# Altium PCB MainBoardPCB.PcbDoc (part 9 of 50)
Units mm, origin at the board's own origin, x right, y up, seen from the top; angles counter-clockwise.
Board outline 258.95 x 308.86 mm, 16 copper layers (L1, L2 (GND), L3 (Sign), L4 (GND), L5 (Sign), L6 (PWR/GND), L7(12V+Other), L8 (Plane_GND), L9 (PWR/GND), L10 (3V3+Other), L11 (PWR/GND), L12 (Sign), L13 (GND), L14 (Sign), L15 (GND), L16), stack 2.503 mm thick; 2578 components, 1867 nets, 8817 pads, 8021 vias.
Unrouted connection lines stored in the file: 25.
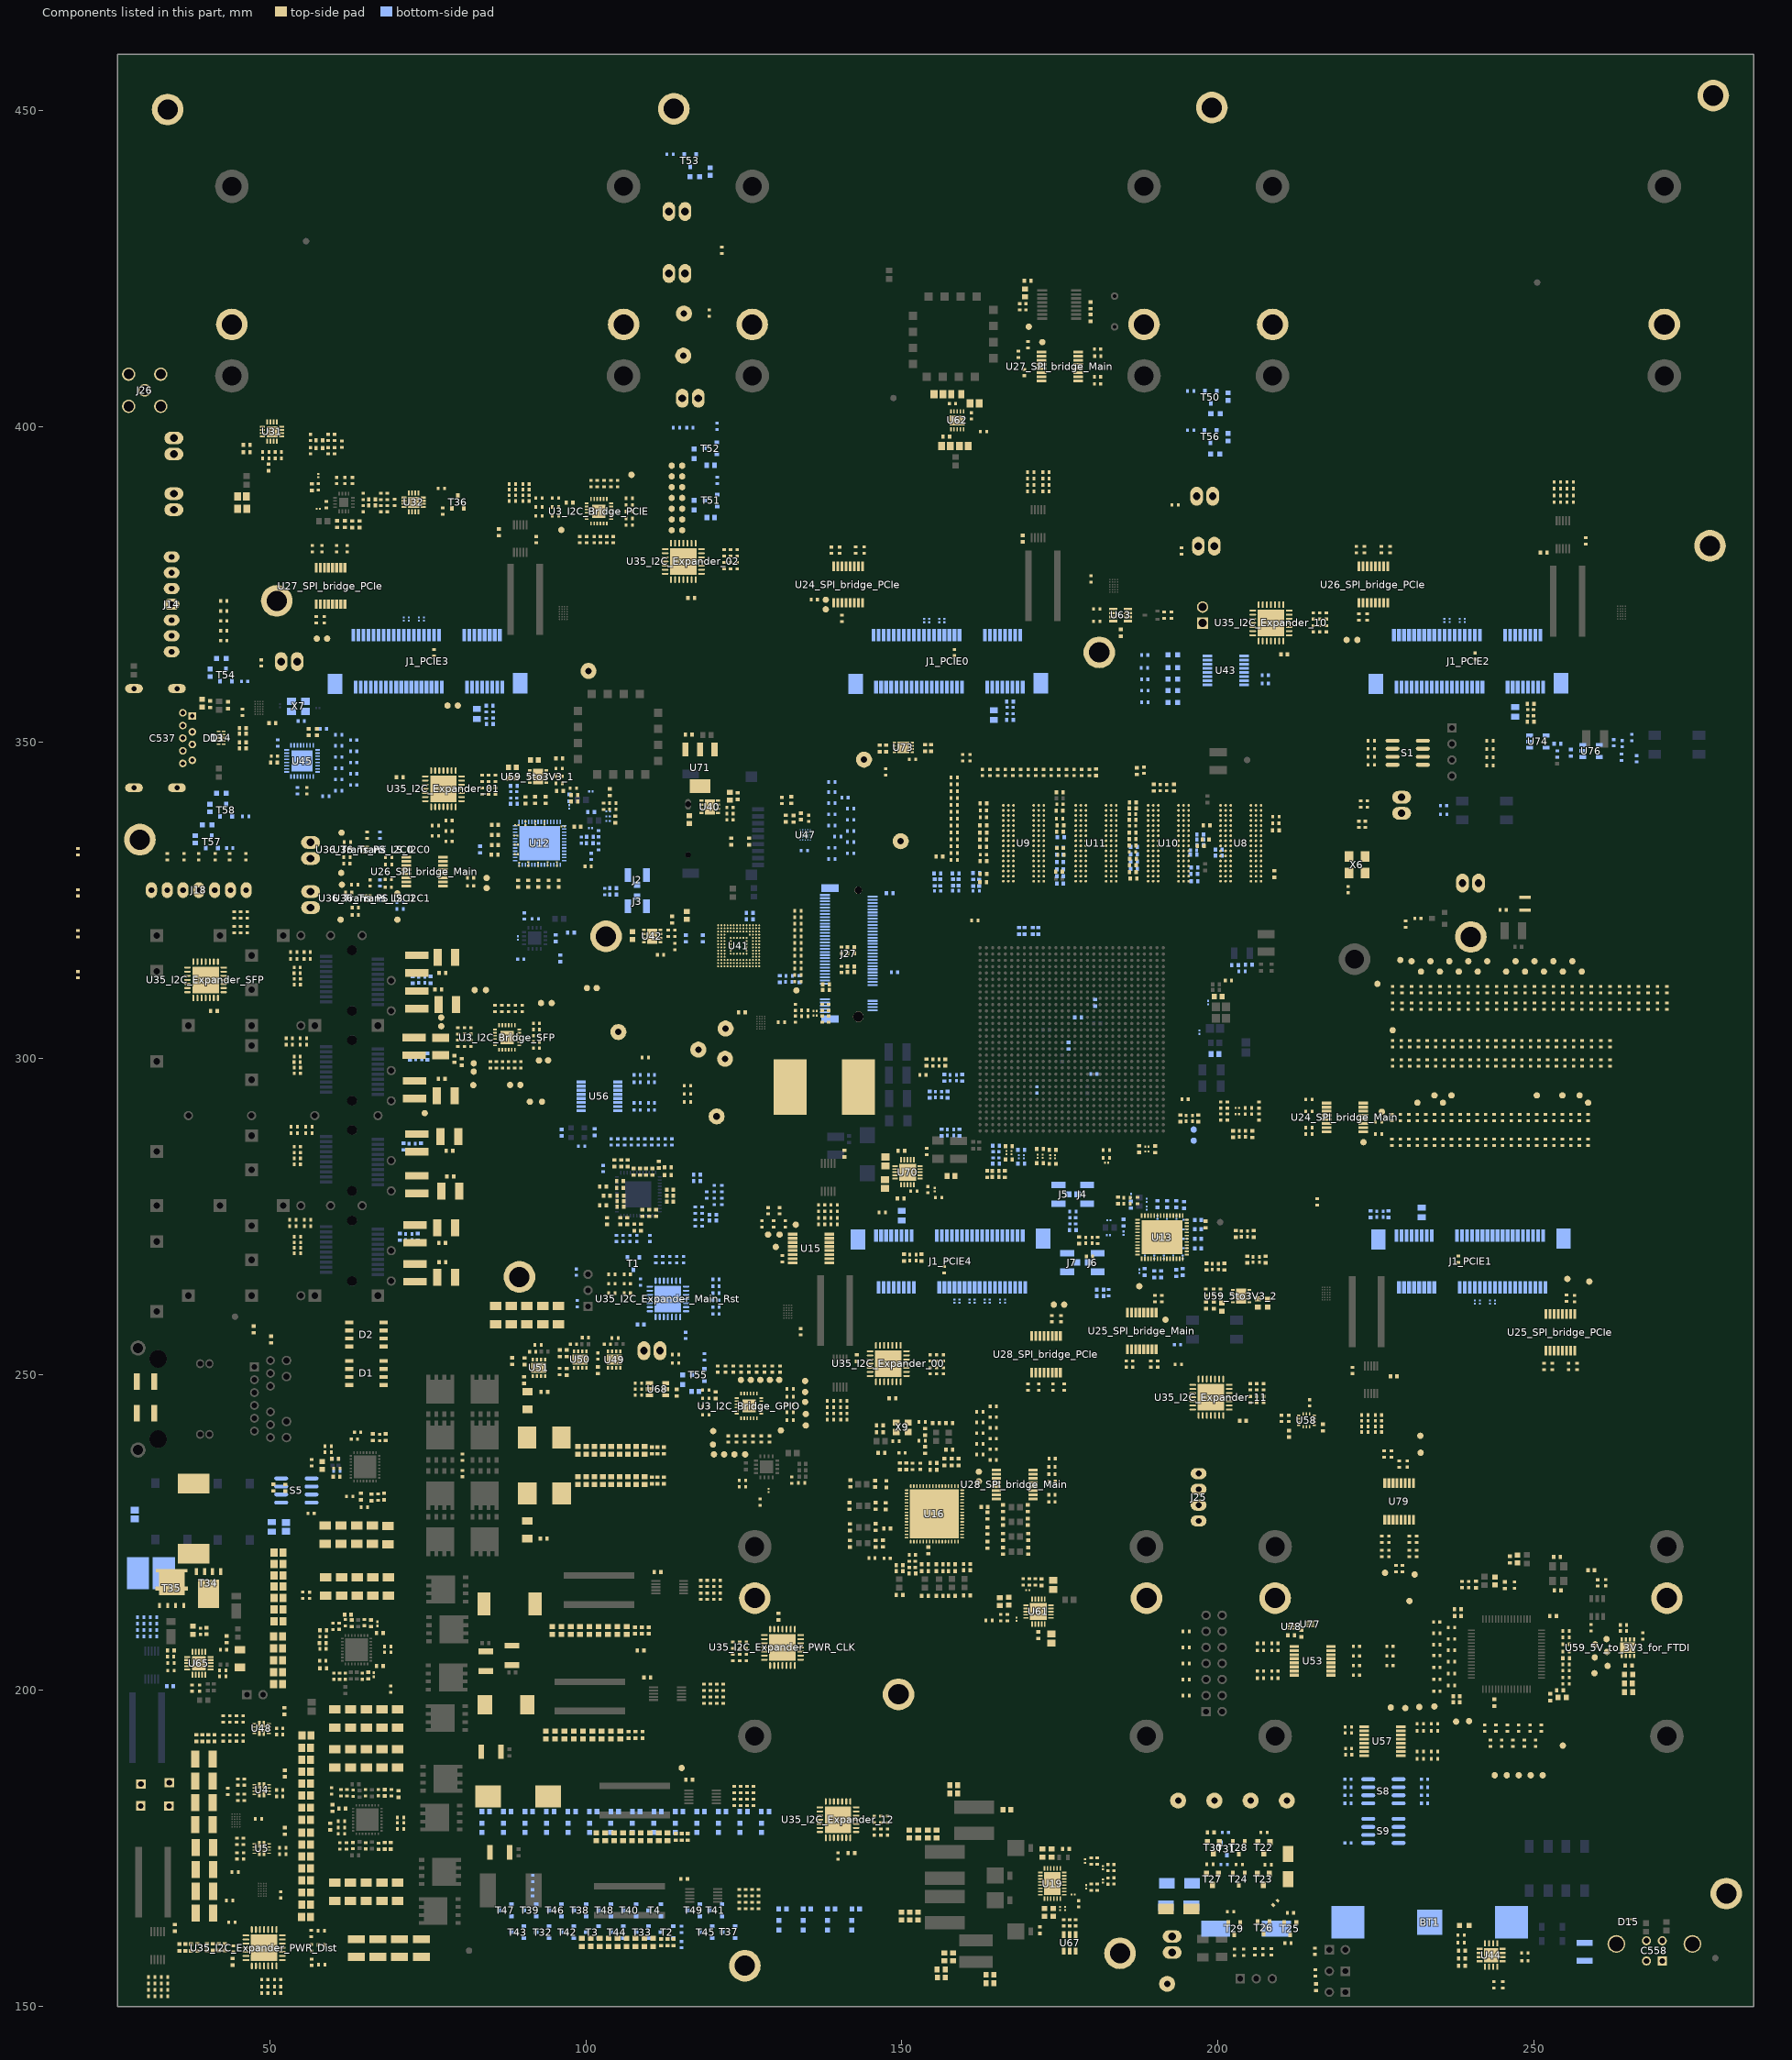
[diagram p21: the components of this part, seen from the top]

## Part data (continued)
C549: library part Capacitor, Case/Package=0402, Case Code (Metric)=1005, Dielectric=X7R, Dielectric Material=Ceramic, Insulation Resistance=100GR, Manufacturer=Yageo, Manufacturer Part Number=CC0402KRX7R9BB221, Max Operating Temperature=125°C, Min Operating Temperature=-55°C, Package Quantity=1, Supplier Part Number 1=311-1035-1-ND, Tolerance=10%, Voltage Rating=50V, Capacitance=220pF, Case Code (Imperial)=0402, ComponentLink1Description=https://datasheet.ciiva.com/5789/1489800-5789552.pdf?src-supplier=Farnell, ComponentLink1URL=https://datasheet.ciiva.com/5789/1489800-5789552.pdf?src-supplier=Farnell, ComponentLink2Description=https://datasheet.ciiva.com/26862/getdatasheetpartid-403476-26862648.pdf?src-supplier=Verical, ComponentLink2URL=https://datasheet.ciiva.com/26862/getdatasheetpartid-403476-26862648.pdf?src-supplier=Verical, ComponentLink3Description=https://datasheet.ciiva.com/143/mlccorderingcode-143968.pdf?src-supplier=Digi-Key, ComponentLink3URL=https://datasheet.ciiva.com/143/mlccorderingcode-143968.pdf?src-supplier=Digi-Key, ComponentLink4Description=https://datasheet.ciiva.com/143/mlccorderingcode-143969.pdf?src-supplier=Digi-Key, ComponentLink4URL=https://datasheet.ciiva.com/143/mlccorderingcode-143969.pdf?src-supplier=Digi-Key, ComponentLink5Description=https://datasheet.ciiva.com/143/mlccorderingcode-143970.pdf?src-supplier=Digi-Key, ComponentLink5URL=https://datasheet.ciiva.com/143/mlccorderingcode-143970.pdf?src-supplier=Digi-Key, ComponentLink6Description=https://datasheet.ciiva.com/11464/upy-gphc-x7r-6-3v-to-50v-8-11464901.pdf?src-supplier=Avnet, ComponentLink6URL=https://datasheet.ciiva.com/11464/upy-gphc-x7r-6-3v-to-50v-8-11464901.pdf?src-supplier=Avnet, ComponentLink7Description=https://datasheet.ciiva.com/8033/1489800-8033623.pdf?src-supplier=Element14, ComponentLink7URL=https://datasheet.ciiva.com/8033/1489800-8033623.pdf?src-supplier=Element14, ComponentLink8Description=https://datasheet.ciiva.com/8033/1489800-8033624.pdf?src-supplier=Element14, ComponentLink8URL=https://datasheet.ciiva.com/8033/1489800-8033624.pdf?src-supplier=Element14, ComponentLink9Description=https://datasheet.ciiva.com/13209/upy-gp-np0-16v-to-50v-8-13209048.pdf?src-supplier=Mouser, ComponentLink9URL=https://datasheet.ciiva.com/13209/upy-gp-np0-16v-to-50v-8-13209048.pdf?src-supplier=Mouser, ComponentLink10Description=https://datasheet.ciiva.com/28450/1489800-28450392.pdf?src-supplier=Element14, ComponentLink10URL=https://datasheet.ciiva.com/28450/1489800-28450392.pdf?src-supplier=Element14, ComponentLink11Description=https://datasheet.ciiva.com/17437/upy-gphc-x7r-6-3v-to-50v-8-17437183.pdf?src-supplier=Avnet+Europe, ComponentLink11URL=https://datasheet.ciiva.com/17437/upy-gphc-x7r-6-3v-to-50v-8-17437183.pdf?src-supplier=Avnet+Europe, Composition=Ceramic, Depth=0.5mm, Halogen Free="Halogen Free", Height=0.5mm, Lead Free="Lead Free", Length=1mm, Mount="Surface Mount", Number of Pins=2, Packaging="Tape and Reel", Pricing 1="1 = 0,10000, 10 = 0,02600, 100 = 0,01180, 500 = 0,00844, 1000 = 0,00662, 2500 = 0,00602, 5000 = 0,00554 (USD)", Radiation Hardening=No, REACH SVHC="No SVHC", RoHS=Yes, Stock 1=92511, Supplier 1=Digi-Key, Termination=SMD/SMT, Thickness=0.022inch, Voltage Rating (DC)=50V, Weight=2.3E-05oz, Width=0.02inch
C558: "WR-COM USB Vertical Type B", Manufacturer="Würth Elektronik eiSos GmbH", partNo=61400413321, ComponentLink1 Description=Manufacturer, ComponentLink1URL=http://www.we-online.de, ComponentLink2 Description=Datasheet, ComponentLink2URL=http://katalog.we-online.de/em/datasheet/61400413321.pdf, Created by="Karrer Zheng", Created Date=10/10/2014, NoPins=4
C567_5to3V3_1 C567_5to3V3_2: library part Capacitor, "CAP CER 2.2UF 6.3V X5R 0402", Case Code (Imperial)=0402, Case Code (Metric)=1005, Dielectric=X5R, Manufacturer="Taiyo Yuden", Manufacturer Part Number=JMK105BJ225KV-F, Max Operating Temperature=85°C, Min Operating Temperature=-55°C, Package Quantity=10000, Supplier Part Number 1=587-5867-1-ND, Tolerance=10%, Voltage Rating=6.3V, Capacitance=2.2uF, Case/Package=0402, Category="Ceramic Capacitors", ComponentLink1Description=https://datasheet.ciiva.com/15921/tmk105b7103kv-15921011.pdf?src-supplier=Onlinecomponents.com, ComponentLink1URL=https://datasheet.ciiva.com/15921/tmk105b7103kv-15921011.pdf?src-supplier=Onlinecomponents.com, ComponentLink2Description=https://datasheet.ciiva.com/30178/cmultilayerceramiccapacitor-30178599.pdf?src-supplier=Onlinecomponents.com, ComponentLink2URL=https://datasheet.ciiva.com/30178/cmultilayerceramiccapacitor-30178599.pdf?src-supplier=Onlinecomponents.com, Composition=Ceramic, Depth=0.5mm, Height=0.5mm, Length=1mm, Mount="Surface Mount", Packaging="Tape and Reel", Pricing 1="1=0,10000, 10=0,06000, 100=0,02650, 500=0,01894, 1000=0,01488, 2500=0,01352, 5000=0,01244 (USD)", Radiation Hardening=No, RoHS=Yes, Stock 1=4812, Supplier 1=Digi-Key, Termination=SMD/SMT, Thickness=0.022inch, Voltage Rating (DC)=6.3V, Width=0.5mm
C571 C719: library part Capacitor, "CAP CER 1000PF 25V X5R 0201", Case/Package=0201, Dielectric=X5R, Manufacturer=Murata, Manufacturer Part Number=GRM033R61E102KA01D, Max Operating Temperature=85°C, Min Operating Temperature=-55°C, Supplier Part Number 1=490-14452-1-ND, Tolerance=10%, Voltage Rating (DC)=25V, Capacitance=1nF, Category="Ceramic Capacitors", ComponentLink1Description=http://components.arrow.com/part/dataview/0323_06094941?src-supplier=Arrow+Europe, ComponentLink1URL=http://components.arrow.com/part/dataview/0323_06094941?src-supplier=Arrow+Europe, ComponentLink2Description=https://search.murata.co.jp/Ceramy/image/img/A01X/G101/ENG/GRM033R61E102KA01-01.pdf?src-supplier=Digi-Key, ComponentLink2URL=https://search.murata.co.jp/Ceramy/image/img/A01X/G101/ENG/GRM033R61E102KA01-01.pdf?src-supplier=Digi-Key, ComponentLink3Description=http://search.murata.co.jp/Ceramy/image/img/A01X/G101/ENG/GRM033R61E102KA01-01.pdf?src-supplier=Digi-Key, ComponentLink3URL=http://search.murata.co.jp/Ceramy/image/img/A01X/G101/ENG/GRM033R61E102KA01-01.pdf?src-supplier=Digi-Key, Depth=0.3mm, Length=0.6mm, Packaging="Tape and Reel", Pricing 1="1=0,10000, 10=0,01800, 100=0,00790, 500=0,00564, 1000=0,00443, 2500=0,00402, 5000=0,00370 (USD)", RoHS=Yes, Stock 1=80983, Supplier 1=Digi-Key, Thickness=300um, Width=300um
C595 C596 C695 C696 C697 C698 C699: library part Capacitor, Dielectric=X5R, Manufacturer=Murata, Manufacturer Part Number=GRM21BR61H106KE43L, Supplier Part Number 1=490-18663-1-ND, Tolerance=10%, Voltage Rating (DC)=50V, Capacitance=10uF, Category="Ceramic Capacitors", Length=2mm, Pricing 1="1=0,49000, 10=0,33800, 100=0,20270, 500=0,15198, 1000=0,12835 (USD)", RoHS=No, Stock 1=3437, Supplier 1=Digi-Key, Thickness=1.25mm, Width=1.25mm
C603 C612: library part Capacitor, Case Code (Imperial)=0201, Case Code (Metric)=0603, Dielectric=C0G, Manufacturer=Murata, Manufacturer Part Number=GRM0335C1H430GA01D, Max Operating Temperature=125°C, Min Operating Temperature=-55°C, Package Quantity=15000, Supplier Part Number 1=490-14799-1-ND, Tolerance=2%, Voltage Rating=50V, Capacitance=43pF, Case/Package=0201, ComponentLink1Description=http://components.arrow.com/part/dataview/0323_07279725?src-supplier=Arrow+Europe, ComponentLink1URL=http://components.arrow.com/part/dataview/0323_07279725?src-supplier=Arrow+Europe, ComponentLink2Description=http://www.mouser.com/ds/2/281/c02e-2905.pdf?src-supplier=Mouser, ComponentLink2URL=http://www.mouser.com/ds/2/281/c02e-2905.pdf?src-supplier=Mouser, ComponentLink3Description=http://components.arrow.com/part/dataview/55790600S306921N2606?src-supplier=Arrow, ComponentLink3URL=http://components.arrow.com/part/dataview/55790600S306921N2606?src-supplier=Arrow, ComponentLink4Description=https://search.murata.co.jp/Ceramy/image/img/A01X/G101/ENG/GRM0335C1H430GA01-01.pdf?src-supplier=Digi-Key, ComponentLink4URL=https://search.murata.co.jp/Ceramy/image/img/A01X/G101/ENG/GRM0335C1H430GA01-01.pdf?src-supplier=Digi-Key, ComponentLink5Description=http://search.murata.co.jp/Ceramy/image/img/A01X/partnumbering_e_01.pdf?src-supplier=Digi-Key, ComponentLink5URL=http://search.murata.co.jp/Ceramy/image/img/A01X/partnumbering_e_01.pdf?src-supplier=Digi-Key, ComponentLink6Description=http://psearch.en.murata.com/capacitor/product/GRM0335C1H430GA01%23.pdf?src-supplier=Avnet, ComponentLink6URL=http://psearch.en.murata.com/capacitor/product/GRM0335C1H430GA01%23.pdf?src-supplier=Avnet, Depth=0.3mm, Lead Free="Lead Free", Length=0.024inch, Mount="Surface Mount", Packaging="Tape and Reel", Pricing 1="1 = 0,10000, 10 = 0,01800, 100 = 0,00810, 500 = 0,00578, 1000 = 0,00454, 2500 = 0,00412, 5000 = 0,00380 (USD)", RoHS=Yes, Stock 1=52010, Supplier 1=Digi-Key, Termination=SMD/SMT, Thickness=0.012inch, Voltage Rating (DC)=50V, Width=0.012inch
C605 C616: library part Capacitor, Case Code (Imperial)=0201, Case Code (Metric)=0603, Dielectric=C0G, Manufacturer=Murata, Manufacturer Part Number=GRM0335C1E101JA01D, Max Operating Temperature=125°C, Min Operating Temperature=-55°C, Package Quantity=15000, Supplier Part Number 1=490-3160-1-ND, Tolerance=5%, Voltage=25V, Capacitance=100pF, Case/Package=0201, ComponentLink1Description=https://datasheet.ciiva.com/16497/grm0335c1e101ja01-01-16497112.pdf?src-supplier=Future+Electronics, ComponentLink1URL=https://datasheet.ciiva.com/16497/grm0335c1e101ja01-01-16497112.pdf?src-supplier=Future+Electronics, ComponentLink2Description=https://datasheet.ciiva.com/18697/product-18697797.pdf?src-supplier=Digi-Key, ComponentLink2URL=https://datasheet.ciiva.com/18697/product-18697797.pdf?src-supplier=Digi-Key, Depth=0.3mm, Height=0.3mm, Lead Free="Lead Free", Length=0.6mm, Mount="Surface Mount", Packaging="Tape and Reel", Pricing 1="1 = 0,10000, 10 = 0,01300, 100 = 0,00560, 500 = 0,00400, 1000 = 0,00315, 2500 = 0,00286, 5000 = 0,00263 (USD)", Radiation Hardening=No, REACH SVHC="No SVHC", RoHS=Yes, Stock 1=1884783, Supplier 1=Digi-Key, Termination=SMD/SMT, Thickness=0.013inch, Voltage Rating=25V, Voltage Rating (DC)=25V, Width=0.012inch
C609: "Supercapacitors / Ultracapacitors 0.22F 5.5volts SMD Super Capacitor", Capacitance=220mF, Case/Package=Radial, ESR (Equivalent Series Resistance)=25R, Leakage Current=330uA, Manufacturer=KEMET, Max Operating Temperature=70°C, Min Operating Temperature=-25°C, Package Quantity=500, Supplier Part Number 1=18X4838, Tolerance=80%, Voltage=5.5V, Category=Capacitors, ComponentLink1Description=https://datasheet.ciiva.com/29533/docfinderpartnumber-fc0h224zftbr24-29533957.pdf?src-supplier=Digi-Key, ComponentLink1URL=https://datasheet.ciiva.com/29533/docfinderpartnumber-fc0h224zftbr24-29533957.pdf?src-supplier=Digi-Key, ComponentLink2Description=https://datasheet.ciiva.com/46644/70368307-46644566.pdf?src-supplier=Allied+Electronics, ComponentLink2URL=https://datasheet.ciiva.com/46644/70368307-46644566.pdf?src-supplier=Allied+Electronics, ComponentLink3Description=https://datasheet.ciiva.com/28448/1754672-28448906.pdf?src-supplier=Element14, ComponentLink3URL=https://datasheet.ciiva.com/28448/1754672-28448906.pdf?src-supplier=Element14, ComponentLink4Description=https://datasheet.ciiva.com/29984/kem-s6011-fc-29984986.pdf?src-supplier=Avnet, ComponentLink4URL=https://datasheet.ciiva.com/29984/kem-s6011-fc-29984986.pdf?src-supplier=Avnet, Depth=8.5mm, Diameter=10.5mm, Height=8.5mm, Height - Seated (Max)=0.335inch, Lead Pitch=5mm, Length=10.8mm, Manufacturer Part Number=FC0H224ZFTBR24, Mount="Surface Mount", Packaging="Tape and Reel", Radiation Hardening=No, REACH SVHC="No SVHC", RoHS=Yes, Supplier 1=Newark, Termination=SMD/SMT, Voltage Rating=5.5V, Voltage Rating (DC)=5.5V, Width=10.8mm
C627: library part Capacitor, "CAP CER 0.1UF 16V X5R 0201", Case/Package=0201, Case Code (Metric)=0603, Dielectric=X5R, Manufacturer=Murata, Manufacturer Part Number=GRM033R61C104ME84D, Max Operating Temperature=85°C, Min Operating Temperature=-55°C, Package Quantity=15000, Supplier Part Number 1=490-9986-1-ND, Tolerance=20%, Voltage Rating=16V, Capacitance=100nF, Case Code (Imperial)=0201, Category="Ceramic Capacitors", ComponentLink1Description=http://www.mouser.com/ds/2/281/c02e-2905.pdf?src-supplier=Mouser, ComponentLink1URL=http://www.mouser.com/ds/2/281/c02e-2905.pdf?src-supplier=Mouser, ComponentLink2Description=http://search.murata.co.jp/Ceramy/image/img/A01X/G101/ENG/GRM033R61C104ME84-01.pdf?src-supplier=Digi-Key, ComponentLink2URL=http://search.murata.co.jp/Ceramy/image/img/A01X/G101/ENG/GRM033R61C104ME84-01.pdf?src-supplier=Digi-Key, Height=0.3mm, Length=0.024inch, Mount="Surface Mount", Packaging="Tape and Reel", Pricing 1="1=0,10000, 10=0,06000, 100=0,02670, 500=0,01906, 1000=0,01497, 2500=0,01361, 5000=0,01252 (USD)", RoHS=Yes, Stock 1=519119, Supplier 1=Digi-Key, Termination=SMD/SMT, Thickness=0.013inch, Voltage Rating (DC)=16V, Weight=1.2E-05oz, Width=0.3mm
C633 C636: library part Capacitor, Case/Package=0402, Case Code (Metric)=1005, Dielectric=U2J, Manufacturer=Murata, Manufacturer Part Number=GRM1557U1A302JA01D, Max Operating Temperature=125°C, Min Operating Temperature=-55°C, Package Quantity=10000, Supplier Part Number 1=490-8243-1-ND, Tolerance=5%, Voltage Rating=10V, Capacitance=3nF, Case Code (Imperial)=0402, ComponentLink1Description=https://datasheet.ciiva.com/11620/product-11620441.pdf?src-supplier=Avnet, ComponentLink1URL=https://datasheet.ciiva.com/11620/product-11620441.pdf?src-supplier=Avnet, ComponentLink2Description=https://datasheet.ciiva.com/29542/partnumbering-e-01-29542685.pdf?src-supplier=Digi-Key, ComponentLink2URL=https://datasheet.ciiva.com/29542/partnumbering-e-01-29542685.pdf?src-supplier=Digi-Key, ComponentLink3Description=https://datasheet.ciiva.com/29542/partnumbering-e-01-29542686.pdf?src-supplier=Digi-Key, ComponentLink3URL=https://datasheet.ciiva.com/29542/partnumbering-e-01-29542686.pdf?src-supplier=Digi-Key, ComponentLink4Description=https://datasheet.ciiva.com/29542/partnumbering-e-01-29542687.pdf?src-supplier=Digi-Key, ComponentLink4URL=https://datasheet.ciiva.com/29542/partnumbering-e-01-29542687.pdf?src-supplier=Digi-Key, Depth=0.5mm, Height=0.5mm, Lead Free="Lead Free", Length=1mm, Mount="Surface Mount", Packaging="Tape and Reel", Pricing 1="1 = 0,22000, 10 = 0,14700, 100 = 0,07450, 500 = 0,05100, 1000 = 0,04511, 2500 = 0,04315, 5000 = 0,03923 (USD)", Radiation Hardening=No, RoHS=Yes, Stock 1=13189, Supplier 1=Digi-Key, Termination=SMD/SMT, Thickness=0.022inch, Voltage Rating (DC)=10V, Width=0.5mm